# Allegro board mib_rev2_v206_stripped.brd
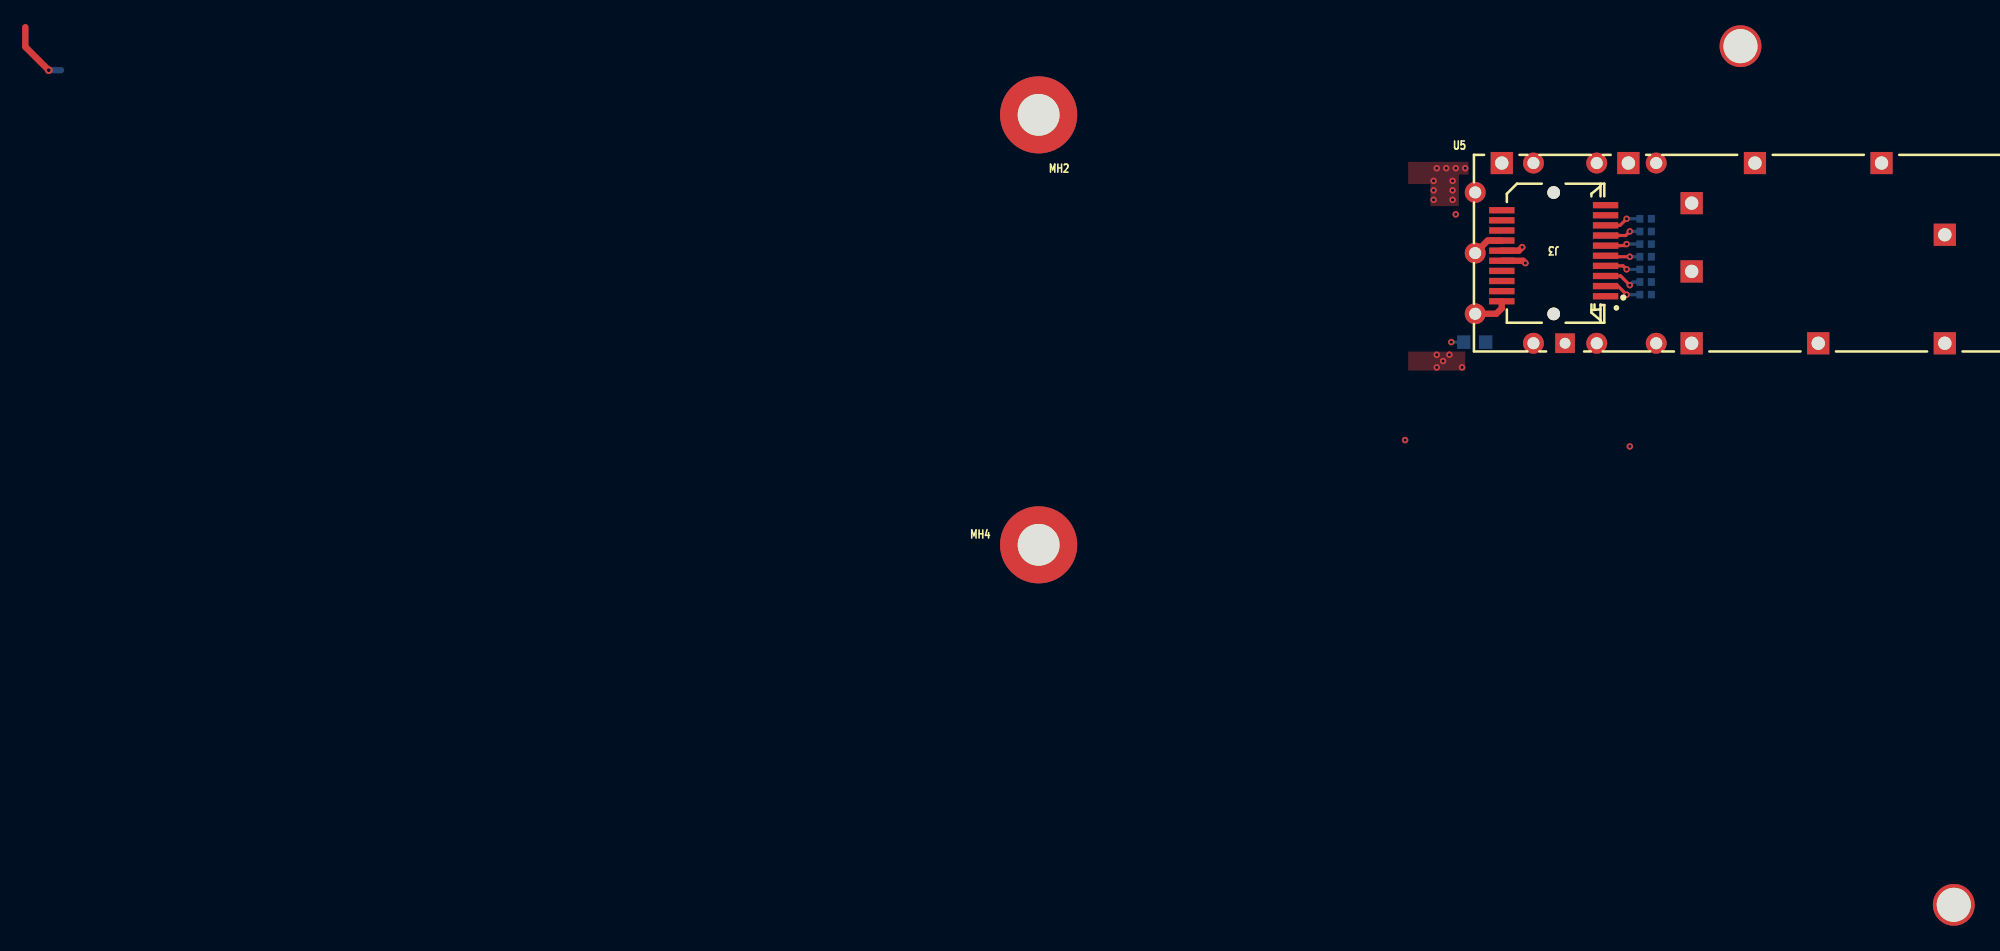
[diagram p0: board, top side]
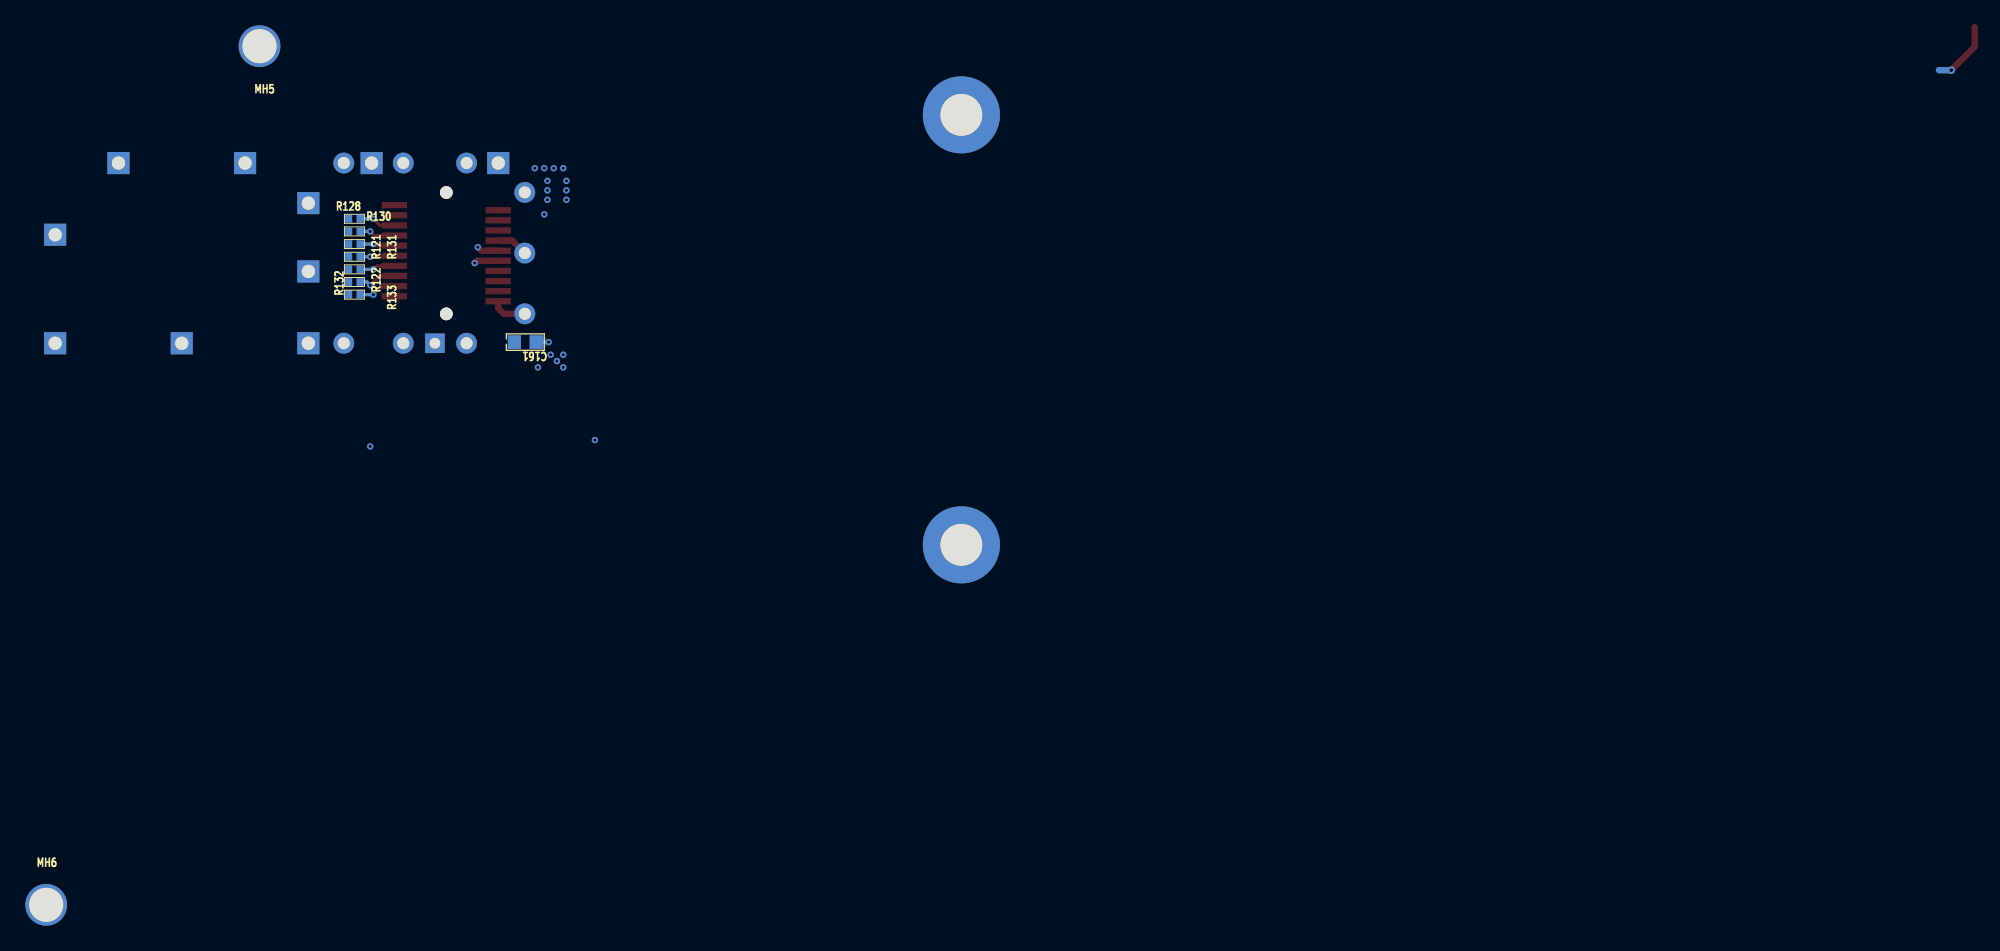
[diagram p1: board, bottom side, seen from below]

No outline. copper layers: TOP, 02_GND, 03_SIG1, 04_GND, 05_PWR1, 06_GND, 07_SIG2, 08_GND, 09_SIG3, BOTTOM. Coordinates in mm from the lowest, leftmost part position.

## Design rules (mm)
constraint set DEFAULT: min track width 0.127
net group AMC_N_PS<0>: nets AMC_N_PS<0> N00473
net group AMC_N_PS<1>: nets AMC_N_PS<1> N00497
net group AUXIO_0: nets AUXIO_N0 AUXIO_P0
net group AUXIO_1: nets AUXIO_N1 AUXIO_P1
net group AUXIO_2: nets AUXIO_N2 AUXIO_P2
net group AUXIO_3: nets AUXIO_N3 AUXIO_P3
net group AUXIO_4: nets AUXIO_N4 AUXIO_P4
net group AUXIO_5: nets AUXIO_N5 AUXIO_P5
net group AUXIO_6: nets AUXIO_N6 AUXIO_P6
net group AUXIO_7: nets AUXIO_N7 AUXIO_P7
net group BLUE_LED: nets BLUE_LED N00503
net group CLK_TST: nets CLK_TST_N CLK_TST_P
net group CLKIN0_N: nets CLKIN0_N SFP0_CLKGEN_N
net group CLKIN0_P: nets CLKIN0_P SFP0_CLKGEN_P
net group CLKIN1_N: nets CLKIN1_N SFP1_CLKGEN_N
net group CLKIN1_P: nets CLKIN1_P SFP1_CLKGEN_P
net group CLKIN2: nets CLKIN2_N CLKIN2_P
net group CLKIN3_N: nets CLKIN3_N FBCLK_N
net group CLKIN3_P: nets CLKIN3_P FBCLK_P
net group DP_AUX_GBE_RX: nets AUX_GBE_RX_N AUX_GBE_RX_P
net group DP_AUX_GBE_TX: nets AUX_GBE_TX_N AUX_GBE_TX_P
net group DP_CLK0: nets CLK_N<0> CLK_P<0>
net group DP_CLK1: nets CLK_N<1> CLK_P<1>
net group DP_DATA_IN0: nets DATA_IN_N<0> DATA_IN_P<0>
net group DP_DATA_IN1: nets DATA_IN_N<1> DATA_IN_P<1>
net group DP_DATA_IN2: nets DATA_IN_N<2> DATA_IN_P<2>
net group DP_DATA_IN3: nets DATA_IN_N<3> DATA_IN_P<3>
net group DP_DATA_IN4: nets DATA_IN_N<4> DATA_IN_P<4>
net group DP_DATA_IN5: nets DATA_IN_N<5> DATA_IN_P<5>
net group DP_DATA_IN6: nets DATA_IN_N<6> DATA_IN_P<6>
net group DP_DATA_IN7: nets DATA_IN_N<7> DATA_IN_P<7>
net group DP_DATA_IN8: nets DATA_IN_N<8> DATA_IN_P<8>
net group DP_DATA_IN9: nets DATA_IN_N<9> DATA_IN_P<9>
net group DP_DATA_IN10: nets DATA_IN_N<10> DATA_IN_P<10>
net group DP_DATA_IN11: nets DATA_IN_N<11> DATA_IN_P<11>
net group DP_DATA_OUT0: nets DATA_OUT_N<0> DATA_OUT_P<0>
net group DP_DATA_OUT1: nets DATA_OUT_N<1> DATA_OUT_P<1>
net group DP_DATA_OUT2: nets DATA_OUT_N<2> DATA_OUT_P<2>
net group DP_DATA_OUT3: nets DATA_OUT_N<3> DATA_OUT_P<3>
net group DP_DATA_OUT4: nets DATA_OUT_N<4> DATA_OUT_P<4>
net group DP_DATA_OUT5: nets DATA_OUT_N<5> DATA_OUT_P<5>
net group DP_DATA_OUT6: nets DATA_OUT_N<6> DATA_OUT_P<6>
net group DP_DATA_OUT7: nets DATA_OUT_N<7> DATA_OUT_P<7>
net group DP_DATA_OUT8: nets DATA_OUT_N<8> DATA_OUT_P<8>
net group DP_DATA_OUT9: nets DATA_OUT_N<9> DATA_OUT_P<9>
net group DP_DATA_OUT10: nets DATA_OUT_N<10> DATA_OUT_P<10>
net group DP_DATA_OUT11: nets DATA_OUT_N<11> DATA_OUT_P<11>
net group DP_DC_REF_CLK0: nets DC_REF_CLK_N<0> DC_REF_CLK_P<0>
net group DP_DC_REF_CLK1: nets DC_REF_CLK_N<1> DC_REF_CLK_P<1>
net group DP_DC_REF_CLK2: nets DC_REF_CLK_N<2> DC_REF_CLK_P<2>
net group DP_DC_REF_CLK3: nets DC_REF_CLK_N<3> DC_REF_CLK_P<3>
net group DP_DC_REF_CLK4: nets DC_REF_CLK_N<4> DC_REF_CLK_P<4>
net group DP_DC_REF_CLK5: nets DC_REF_CLK_N<5> DC_REF_CLK_P<5>
net group DP_DC_REF_CLK6: nets DC_REF_CLK_N<6> DC_REF_CLK_P<6>
net group DP_DC_REF_CLK7: nets DC_REF_CLK_N<7> DC_REF_CLK_P<7>
net group DP_DC_REF_CLK8: nets DC_REF_CLK_N<8> DC_REF_CLK_P<8>
net group DP_DC_REF_CLK9: nets DC_REF_CLK_N<9> DC_REF_CLK_P<9>
net group DP_DC_REF_CLK10: nets DC_REF_CLK_N<10> DC_REF_CLK_P<10>
net group DP_DC_REF_CLK11: nets DC_REF_CLK_N<11> DC_REF_CLK_P<11>
net group DP_DFF_REF_CLK0: nets DFF_REF_CLK_N<0> DFF_REF_CLK_P<0>
net group DP_DFF_REF_CLK1: nets DFF_REF_CLK_N<1> DFF_REF_CLK_P<1>
net group DP_DFF_REF_CLK2: nets DFF_REF_CLK_N<2> DFF_REF_CLK_P<2>
net group DP_GBE_RX: nets GBE_RX_N GBE_RX_P
net group DP_GBE_TX: nets GBE_TX_N GBE_TX_P
net group DP_REF_CLK0: nets REF_CLK_N<0> REF_CLK_P<0>
net group DP_REF_CLK1: nets REF_CLK_N<1> REF_CLK_P<1>
net group DP_REF_CLK2: nets REF_CLK_N<2> REF_CLK_P<2>
net group DP_REF_CLK3: nets REF_CLK_N<3> REF_CLK_P<3>
net group DP_REF_CLK4: nets REF_CLK_N<4> REF_CLK_P<4>
net group DP_REF_CLK5: nets REF_CLK_N<5> REF_CLK_P<5>
net group DP_REF_CLK6: nets REF_CLK_N<6> REF_CLK_P<6>
net group DP_REF_CLK7: nets REF_CLK_N<7> REF_CLK_P<7>
net group DP_REF_CLK8: nets REF_CLK_N<8> REF_CLK_P<8>
net group DP_REF_CLK9: nets REF_CLK_N<9> REF_CLK_P<9>
net group DP_REF_CLK10: nets REF_CLK_N<10> REF_CLK_P<10>
net group DP_REF_CLK11: nets REF_CLK_N<11> REF_CLK_P<11>
net group DP_SFP_TD0: nets SFP_TD_N<0> SFP_TD_P<0>
net group DP_SFP_TD1: nets SFP_TD_N<1> SFP_TD_P<1>
net group DP_SFP_TD2: nets SFP_TD_N<2> SFP_TD_P<2>
net group DP_UPSTREAM_DATA0: nets UPSTREAM_DATA_N_<0> UPSTREAM_DATA_P<0>
net group DP_UPSTREAM_DATA1: nets UPSTREAM_DATA_N_<1> UPSTREAM_DATA_P<1>
net group DP_UPSTREAM_DATA2: nets UPSTREAM_DATA_N_<2> UPSTREAM_DATA_P<2>
net group DP_XTAL: nets XA XB
net group DPDFF_CLK0: nets DFF_CLK_N<0> DFF_CLK_P<0>
net group DPDFF_CLK1: nets DFF_CLK_N<1> DFF_CLK_P<1>
net group DPDFF_CLK2: nets DFF_CLK_N<2> DFF_CLK_P<2>
net group DPUDATA_IN0: nets UDATA_IN_N<0> UDATA_IN_P<0>
net group DPUDATA_IN1: nets UDATA_IN_N<1> UDATA_IN_P<1>
net group DPUDATA_IN2: nets UDATA_IN_N<2> UDATA_IN_P<2>
net group FPGA_TCK: nets FPGA_TCK TCK
net group FPGA_TDI: nets FPGA_TDI TDI
net group FPGA_TDO: nets FPGA_TDO TDO
net group FPGA_TMS: nets FPGA_TMS TMS
net group IMPB_SCL: nets IMPB_SCL N00469
net group RCLK_N0: nets RCLK_N0 REFCLK_OUT0_N
net group RCLK_N1: nets RCLK_N1 REFCLK_OUT1_N
net group SCOPE_N: nets SCOPE_N UNNAMED_2_CAPCERSMDCL2_I367_B
net group SCOPE_P: nets SCOPE_P UNNAMED_2_CAPCERSMDCL2_I366_B
net group SENSE_I2C_SCL: nets N00471 SENSE_I2C_SCL
net group SFP2_CLKGEN: nets SFP2_CLKGEN_N SFP2_CLKGEN_P
net group SFP_DATA_OUT_N<0>: nets DATA_FROM_UPSTREAM_N<0> SFP_DATA_OUT_N<0>
net group SFP_DATA_OUT_N<1>: nets DATA_FROM_UPSTREAM_N<1> SFP_DATA_OUT_N<1>
net group SFP_DATA_OUT_N<2>: nets DATA_FROM_UPSTREAM_N<2> SFP_DATA_OUT_N<2>
net group SFP_DATA_OUT_P<0>: nets DATA_FROM_UPSTREAM_P<0> SFP_DATA_OUT_P<0>
net group SFP_DATA_OUT_P<1>: nets DATA_FROM_UPSTREAM_P<1> SFP_DATA_OUT_P<1>
net group SFP_DATA_OUT_P<2>: nets DATA_FROM_UPSTREAM_P<2> SFP_DATA_OUT_P<2>
net group SFP_RD_N<0>: nets SFP_RD_N<0> UNNAMED_1_R_I558_2
net group SFP_RD_N<1>: nets SFP_RD_N<1> UNNAMED_1_R_I567_2
net group SFP_RD_N<2>: nets SFP_RD_N<2> UNNAMED_1_R_I574_2
net group SFP_RD_P<0>: nets SFP_RD_P<0> UNNAMED_1_R_I559_2
net group SFP_RD_P<1>: nets SFP_RD_P<1> UNNAMED_1_R_I568_2
net group SFP_RD_P<2>: nets SFP_RD_P<2> UNNAMED_1_R_I575_2
net group VP1V8: nets N00904 VP1V8
net group VP12: nets PRESENCE_12V VP12
net group AMC_GA<0>: nets AMC_GA<0> AMC_GA<1> AMC_GA<2> N00481
net group BP_1: nets AMC_N_ENABLE IMPB_SDA PWR_ON TCK_2 TDI_2 TDO_2 TMS_2
net group CLKGEN_IO_1: nets CLK_INTR CLK_LOL CLK_RST CLK_SCL CLK_SDA CLK_SEL0 CLK_SEL1
net group DP2: nets RCLK_P0
net group POWER: nets DCDC_2V5_PG DCDC_3V3_PG DCDC_ENABLE LDO_1V8_PG SENSE_I2C_SDA
net group PWR_GND: nets GND
net group RCLK_P1: nets RCLK_P1 REFCLK_OUT0_P REFCLK_OUT1_P
net group SFP_LOS: nets SFP_LOS<0> SFP_LOS<1> SFP_LOS<2>
net group SFP_RATE_SELECT: nets SFP_RATE_SELECT<0> SFP_RATE_SELECT<1> SFP_RATE_SELECT<2>
net group SFP_SCL: nets SFP_SCL<0> SFP_SCL<1> SFP_SCL<2>
net group SFP_SDA: nets SFP_SDA<0> SFP_SDA<1> SFP_SDA<2>
net group SFP_TX_DISABLE: nets SFP_TX_DISABLE<0> SFP_TX_DISABLE<1> SFP_TX_DISABLE<2>
net group SFP_TX_FAULT: nets SFP_TX_FAULT<0> SFP_TX_FAULT<1> SFP_TX_FAULT<2>
net group VO_2V5: nets VCC2V5_PRE_RSHUNT
net group VO_3V3: nets VCC3V3_PRE_RSHUNT

## Placement (name value [footprint] x y rotation side)
C161  22UF  [CAP0603]  394.83 147.37 0 bottom
J3  1367073-1  [TYCO_1367073]  401.07 154.39 180 top
MH2  MT_HOLE  [MOUNTHOLE]  360.38 165.34 0 top
MH4  MT_HOLE  [MOUNTHOLE]  360.38 131.34 0 top
MH5  MT_HOLE  [MOUNTHOLE]  415.82 170.77 180 bottom
MH6  MT_HOLE  [MOUNTHOLE]  432.67 102.87 180 bottom
NOREF  -  []  398.76 104.43 0 top
NOREF#2  -  []  0 0 0 top
NOREF#3  -  []  228.32 236.47 0 top
NOREF#4  -  []  229.19 222.94 0 top
NOREF#5  -  []  255.83 99.62 0 top
NOREF#6  -  []  217.53 223.65 0 top
R121  2.2K  [RES0402]  408.33 154.12 180 bottom
R122  2.2K  [RES0402]  408.33 153.12 180 bottom
R128  4.99K  [RES0402]  408.33 157.12 180 bottom
R130  4.99K  [RES0402]  408.33 156.12 180 bottom
R131  4.99K  [RES0402]  408.33 155.12 180 bottom
R132  4.99K  [RES0402]  408.33 152.12 180 bottom
R133  4.99K  [RES0402]  408.33 151.12 180 bottom
U5  2227023-1  [SFP_CAGE]  401.07 154.4 180 top

## Library data of the parts
C161 = CAP_NP: Tolerance: TOL?; User Part Number: GRM188R60J226MEA0D; part number: CAP_NP-GRM188R60J226MEA0D,CAP_NP; room: SFP0
J3 = CON20P_SFP-1367073-1: part number: CON20P_SFP-1367073-1-1367073-1,CON20P_SFP-1367073-1; room: SFP0
MH2 MH4 = MT_HOLE: part number: MT_HOLE-MT_HOLE,MT_HOLE; room: TE0712
MH5 MH6 = MT_HOLE: part number: MT_HOLE-MT_HOLE,MT_HOLE
R121 R122 = R: Tolerance: TOL?; User Part Number: ERJ-2RKF2201X; part number: R-ERJ-2RKF2201X,R; room: SFP I2C SWITCH
R128 R130-R133 = R: Tolerance: TOL?; User Part Number: ERJ-2RKF4991X; part number: R-ERJ-2RKF4991X,R; room: SFP0
U5 = SFP_CAGE-2227023-1: part number: SFP_CAGE-2227023-1-2227023-1,SFP_CAGE-2227023-1; room: SFP0

## Footprints (pads in the part's own frame, mm; a bottom-side part is the same pattern mirrored in y, then rotated)
CAP0603
  rect 1.05x1.08 smd: 1(-0.865,0) 2(0.865,0)
MOUNTHOLE
  round 6.096 hole 3.302: 1(0,0)
RES0402
  rect 0.55x0.6 smd: 1(-0.45,0) 2(0.45,0)
SFP_CAGE
  rect 1.75x1.75 hole 1.05: 1(-30.9,7.125) 2(-20.9,7.125) 3(-10.9,7.125) 5(-25.9,-7.125) 6(-15.9,-7.125) 7(-5.9,-7.125) 8(4.1,-7.125) 9(-30.9,-1.455) 10(-10.9,1.445) 11(-10.9,-3.955)
  rect 1.55x1.55 hole 0.85: 4(-0.9,7.125)
  round 1.65 hole 0.95: 12(-8.1,7.125) 13(-3.4,7.125) 14(1.6,7.125) 15(-8.1,-7.125) 16(-3.4,-7.125) 17(1.6,-7.125) 18(6.2,-4.805) 19(6.2,-0.005) 20(6.2,4.796)
TYCO_1367073
  round 1 hole 1.55 unplated: (0,4.795) (0,-4.805)
  rect 2x0.5 smd: 1(-4.1,3.395) 2(-4.1,2.595) 3(-4.1,1.795) 4(-4.1,0.995) 5(-4.1,0.195) 6(-4.1,-0.605) 7(-4.1,-1.405) 8(-4.1,-2.205) 9(-4.1,-3.005) 10(-4.1,-3.805) 11(4.1,-3.405) 12(4.1,-2.605) 13(4.1,-1.805) 14(4.1,-1.005) 15(4.1,-0.205) 16(4.1,0.595) 17(4.1,1.395) 18(4.1,2.195) 19(4.1,2.995) 20(4.1,3.795)

## Nets
GND: C161.2 J3.1 J3.9 J3.10 J3.11 J3.14 J3.17 J3.20(VEET2) MH2.1(MH_SIG) MH4.1(MH_SIG) MH6.1(MH_SIG) U5.1 U5.2 U5.3 U5.4 U5.5 U5.6 U5.7 U5.8 U5.9 U5.10 U5.11 U5.12 U5.13 U5.14 U5.15 U5.16 U5.17 U5.18 U5.19(CG_9) U5.20
VCC3V3: R121.1 R122.1 R128.1 R130.1 R131.1 R132.1 R133.1
VCCR_3V3_2: J3.15
VCCT_3V3_2: C161.1 J3.16
N00183_2: J3.6 R131.2
SFP_LOS<2>: J3.8 R128.2
SFP_RATE_SELECT<2>: J3.7 R130.2
SFP_RD_N<2>: J3.12
SFP_RD_P<2>: J3.13
SFP_SCL<2>: J3.5 R121.2
SFP_SDA<2>: J3.4 R122.2
SFP_TD_N<2>: J3.19
SFP_TD_P<2>: J3.18
SFP_TX_DISABLE<2>: J3.3 R132.2
SFP_TX_FAULT<2>: J3.2 R133.2

Pads without a net: MH5 1

## Via types
v1: diameter 0.508, hole 0.254, TOP to BOTTOM, 28 vias
v2: diameter 0.61, hole 0.305, TOP to BOTTOM, 1 via

## Routing (per net, layer and track width the routed paths; a pad name or vN(x,y) marks a point on that pad's centre or on a via; arc(x,y) is an arc through that point)
GND: length 5.3
  TOP w0.5: J3.20 396.97,150.04 396.53,149.61 U5.20 ; U5.19 395.86,155.4 J3.14
VCCR_3V3_2: length 1.7
  TOP w0.5: v1(398.58,154.87) 398.31,154.6 J3.15
  vias: v1(391.58,160.12) v1(391.58,159.37) v1(391.58,158.62) v1(391.83,161.12) v1(392.58,161.12) v1(393.08,160.12) v1(393.08,159.37) v1(393.08,158.62) v1(393.33,161.12) v1(393.33,157.47) v1(394.08,161.12)
VCCT_3V3_2: length 2.9
  TOP w0.5: v1(398.83,153.62) 398.65,153.8 J3.16
  BOTTOM w0.25: C161.1 v1(392.98,147.37)
  vias: v1(391.83,146.37) v1(391.83,145.37) v1(392.33,145.87) v1(392.83,146.37) v1(393.83,145.37)
N00183_2: length 2.8
  TOP w0.25: J3.6 406.71,155 v1(406.83,155.12)
  BOTTOM w0.25: v1(406.83,155.12) R131.2
SEGMENT1: length 5.1
  TOP w0.5: 280.33,172.27 280.33,170.72 v2(282.18,168.87)
  BOTTOM w0.5: v2(282.18,168.87) 283.15,168.87
SFP_LOS<2>: length 2.9
  TOP w0.25: J3.8 406.31,156.6 v1(406.83,157.12)
  BOTTOM w0.25: v1(406.83,157.12) R128.2
SFP_RATE_SELECT<1>:
  vias: v1(407.08,139.12)
SFP_RATE_SELECT<2>: length 2.8
  TOP w0.25: J3.7 406.76,155.8 v1(407.08,156.12)
  BOTTOM w0.25: v1(407.08,156.12) R130.2
SFP_SCL<2>: length 2.7
  TOP w0.25: J3.5 405.25,154.12 v1(407.08,154.12)
  BOTTOM w0.25: R121.2 v1(407.08,154.12)
SFP_SDA<2>: length 2.8
  TOP w0.25: J3.4 406.55,153.4 v1(406.83,153.12)
  BOTTOM w0.25: v1(406.83,153.12) R122.2
SFP_TX_DISABLE<2>: length 3.1
  TOP w0.25: J3.3 406.35,152.6 v1(407.08,151.87)
  BOTTOM w0.25: v1(407.08,151.87) 407.33,152.12 R132.2
SFP_TX_FAULT<2>: length 3
  TOP w0.25: v1(406.83,151.12) 406.15,151.8 J3.2
  BOTTOM w0.25: v1(406.83,151.12) R133.2
UNNAMED_1_SY58608U_I564_VREF:
  vias: v1(389.33,139.62)

## Copper pours and planes (outline as drawn; the poured copper is in the pictures)
VCCR_3V3_2 on TOP: 394.33,161.62 389.58,161.62 389.58,159.87 391.33,159.87 391.33,158.12 393.58,158.12 393.58,160.62 394.33,160.62
VCCR_3V3_2 on 05_PWR1: 391.33,161.62 408.08,161.62 408.08,154.62 391.33,154.62
VCCT_3V3_2 on TOP: 389.58,146.62 389.58,145.12 394.08,145.12 394.08,146.62
VCCT_3V3_2 on 05_PWR1: 389.33,146.62 389.33,145.12 408.08,145.12 408.08,153.87 391.33,153.87 391.33,146.62 ; 1 cut-out

Small or netless copper shapes (teardrops, artwork), in the pictures only: 5 on TOP, 6 on BOTTOM

## Text on the board
User.Comments: CR_TPS7A85_3.3_4AMPS_1 | CR_SFP_V0_2 | CR_SFP_V0_3 | CR_SFP_V1_1 | CR_CDR_1_1 | CR_CLK_GEN_1
XSECTION_CHART: *  SURFACE - AIR 0 MM(+0/-0) | L1 TOP CONDUCTOR - 1OZ_COPPER 0.035 MM(+0.00254/-0.00254) | *  DIELECTRIC - FR-4 0.12 MM(+0/-0) | L2 02_GND PLANE - 1OZ_COPPER 0.035 MM(+0.00254/-0.00254) | *  DIELECTRIC - FR-4 0.2 MM(+0/-0) | L3 03_SIG1 CONDUCTOR - 1OZ_COPPER 0.035 MM(+0.00254/-0.00254) | L4 04_GND PLANE - 1OZ_COPPER 0.035 MM(+0/-0) | L5 05_PWR1 PLANE - 1OZ_COPPER 0.035 MM(+0/-0) | L6 06_GND PLANE - 1OZ_COPPER 0.035 MM(+0.00254/-0.00254) | L7 07_SIG2 CONDUCTOR - 1OZ_COPPER 0.035 MM(+0.00254/-0.00254) | L8 08_GND PLANE - 1OZ_COPPER 0.035 MM(+0.00254/-0.00254) | L9 09_SIG3 CONDUCTOR - 1OZ_COPPER 0.035 MM(+0.00254/-0.00254) | L10 BOTTOM CONDUCTOR - 1OZ_COPPER 0.035 MM(+0.00254/-0.00254) | DESIGN CROSS SECTION CHART | ___________________________ | TOTAL THICKNESS 1.75 MM | 1-10
PAGE_OUTLINE: GODWIN M. MAYERS | 06/19/20 | TEL: 215-898-6809 | EMAIL: MAYERS@HEP.UPENN.EDU | CONTACT: GODWIN M. MAYERS | 209 SOUTH 33RD STREET | PHILADELPHIA PA 19104 | 1 | MICRO-TCA INTERFACE BOARD (MIB) | 06/21/20
User.45: BOARD THICKNESS | BOARD CUTOUT | FIGURE | FINISHED_SIZE | 0.254 | 0.3048 | 0.85 | 0.889 | 0.95 | 1.0 | 1.016 | 1.05 | 1.4 | 2.692 | 3.2 | 3.302 | 0.6 | 0.8 | 0.9906 | 1.45 | 1.524 | 1.55 | DRILL CHART: TOP to BOTTOM | ALL UNITS ARE IN MILLIMETERS | TOLERANCE_DRILL | +0.0/-0.0 | +0.0/-0.254 | +0.0/-0.3051 | +0.0008/-0.0008 | PLATED | NON-PLATED | QTY | 4 | 698 | 562 | 3 | 27 | 7 | 10 | 30 | 28 | 2 | 1 | 6 | 1. BOARD THICKNESS: 1.57mm | 2. MATERIAL: FR4 (RoHS COMPLIANT MATERIAL) OR EQUIVALENT. GLASS | 3. ALL HOLES ARE PLATED THROUGH UNLESS OTHERWISE NOTED | 4. 100 OHM DIFFERENTIAL IMPEDENCE ON (TOP, 03_SIG1, 07_SIG2, 09_SIG3, AND BOTTOM) | 5. ALL TOLERANCES +/-3MILS EXCEPT WHERE NOTED | 6. BOARD EDGE CONNECTORS (DETAIL 1) MUST BE BEVELED FOR EASY INSERTION.  SELECTIVE HARD GOLD FINISH FOR EDGE CONTACTS | 7. BOARD HAS CUTOUT  SEE DETAIL 2 | See layers HardGold_Top and HardGold_Bot for locations | BOARD NAME:MICRO-TCA INTERFACE BOARD (MIB)
